# Altium PCB Urukul.PcbDoc (part 6 of 15)
Units mm, origin at the board's own origin, x right, y up, seen from the top; angles counter-clockwise.
Board outline 161.99 x 100 mm, 6 copper layers (L1, L2, L3, L4, P5, L6), stack 1.548 mm thick; 1078 components, 609 nets, 3798 pads, 2552 vias.
Unrouted connection lines stored in the file: 1.
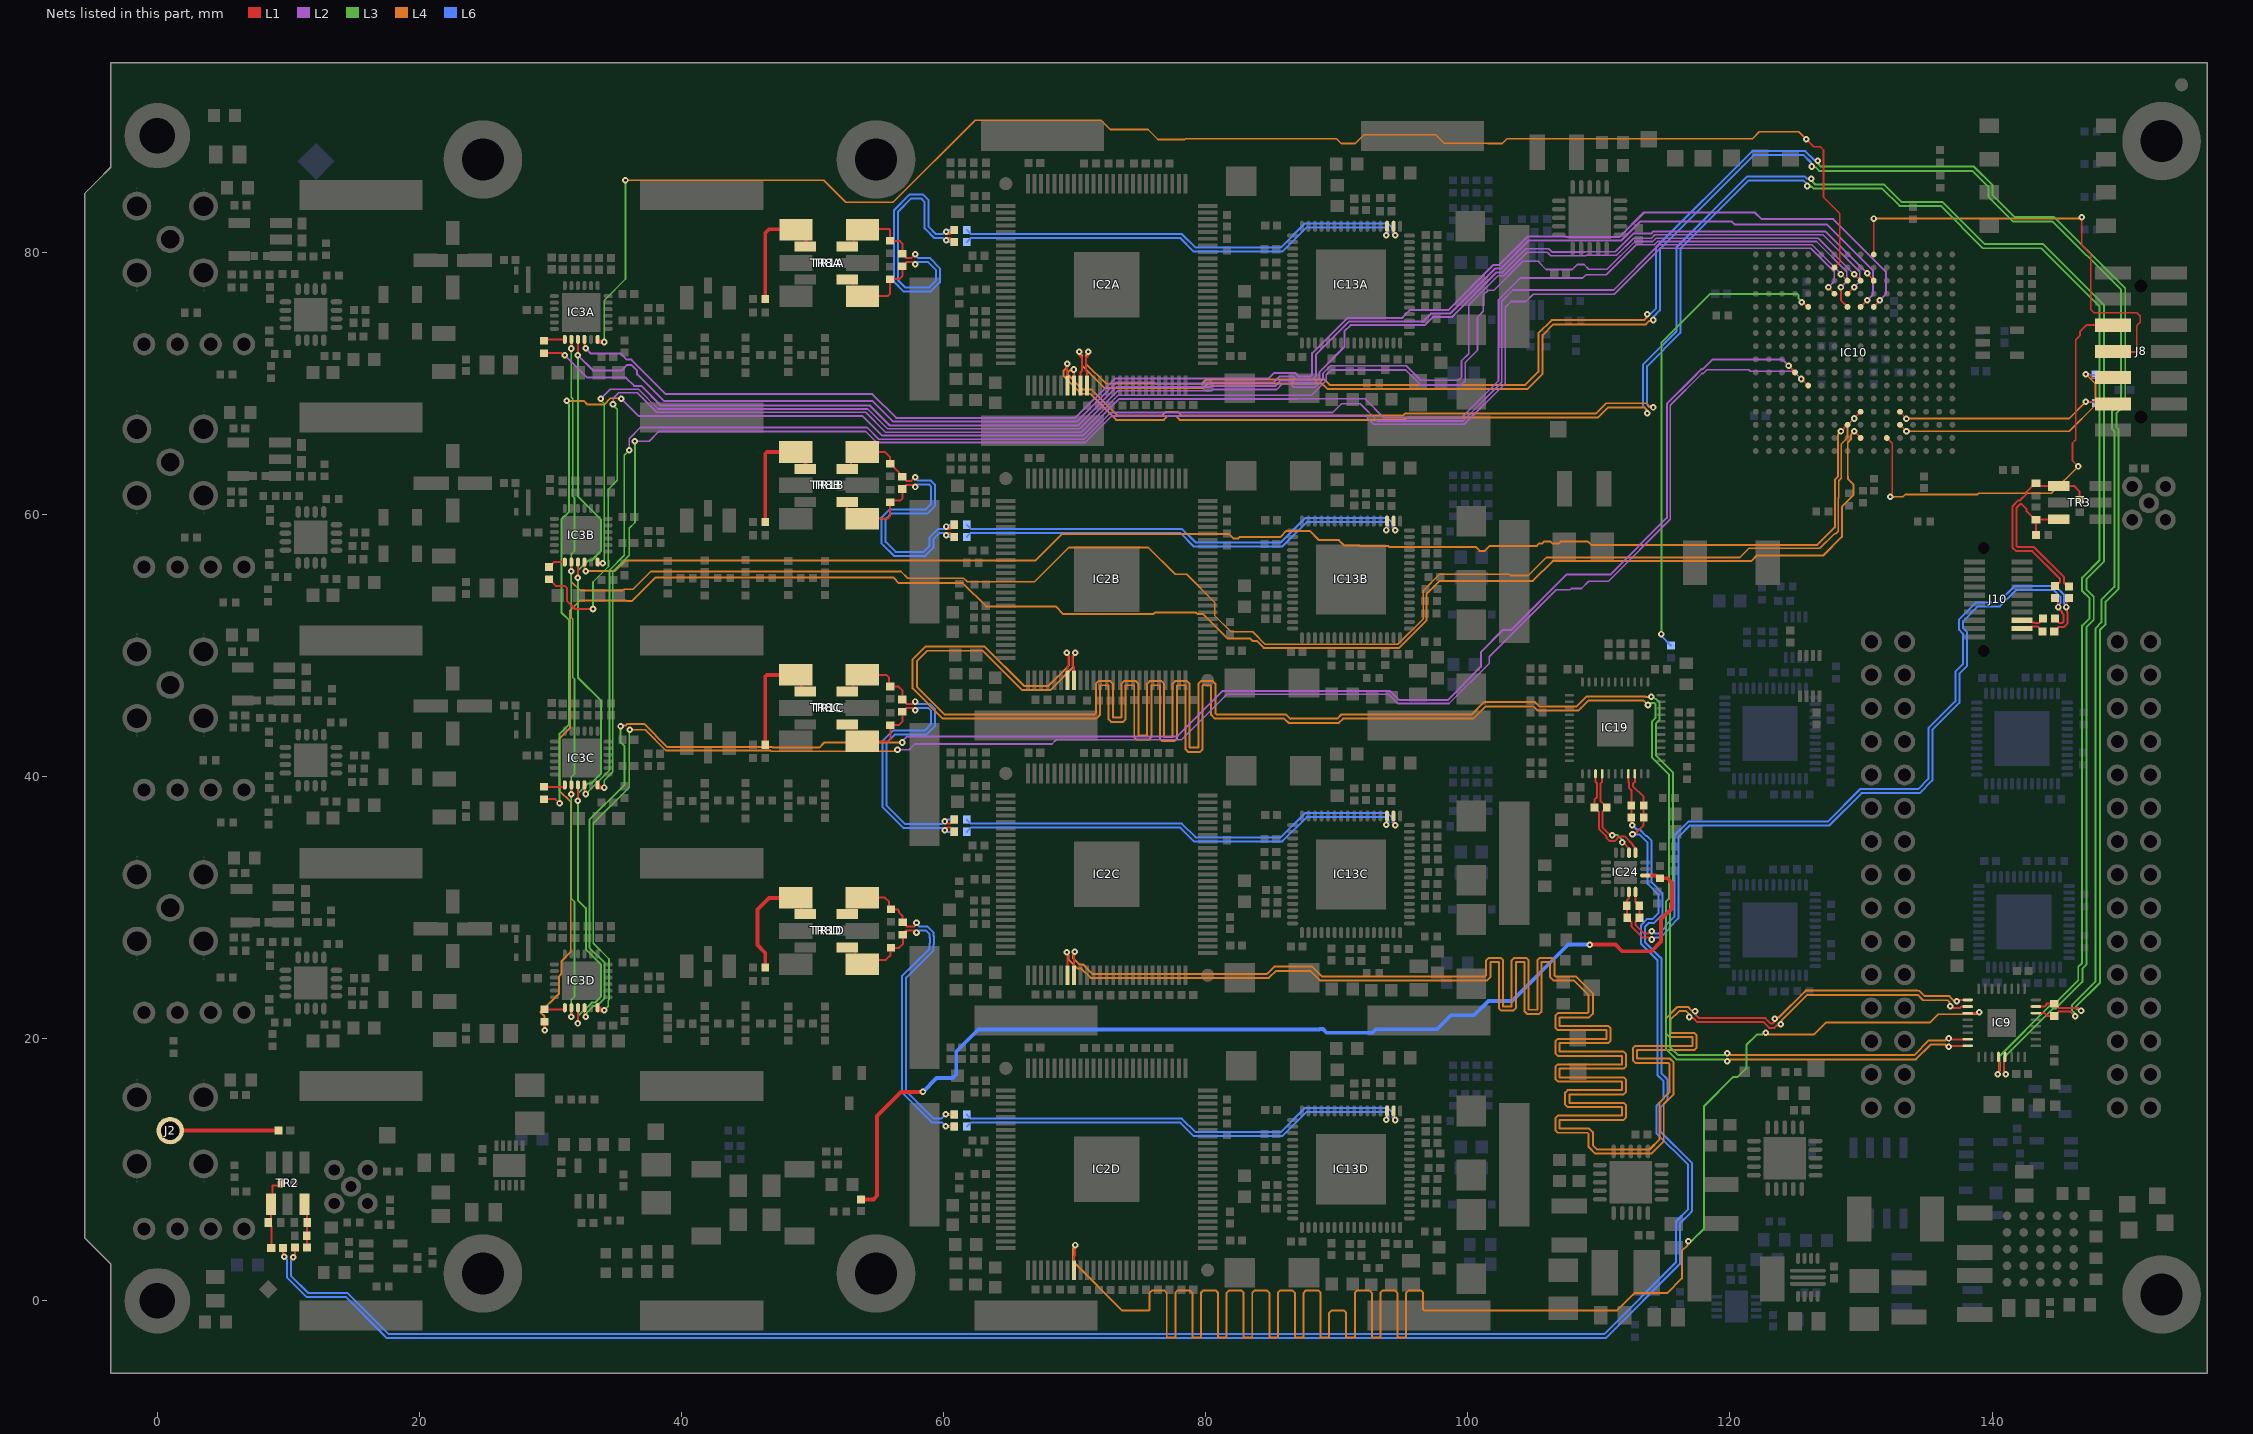
[diagram p8: the nets of this part, all layers, seen from the top]

## Via types
v1: diameter 0.5, hole 0.2, L1 to L6, tented both sides, 1964 vias
v2: diameter 0.5, hole 0.2, L1 to L6, 480 vias
v3: diameter 0.6, hole 0.3, L1 to L6, tented both sides, 52 vias
v4: diameter 0.6, hole 0.3, L1 to L6, 36 vias
v5: diameter 0.762, hole 0.508, L1 to L6, tented both sides, 20 vias

## Nets (pads, with @x,y where several pads share a name; then routed paths per layer and width w, separated by ;. In a path a pad name is that pad's centre, name@x,y a point inside that pad or via, vN(x,y) a via of type N, cw(c..) or ccw(c..) an arc to the next point about the centre after c; other vN are vias at no path point) (continued)
DDS2_SYNC_IN_N: (continued)
  L4 w0.15: v1(70.016,26.633) 70.016,26.538 69.858,26.381 69.858,26.158 70.352,25.664 70.635,25.664 71.346,24.953 84.688,24.953 85.237,25.502 88.111,25.502 88.865,24.748 101.134,24.748 101.303,24.748 101.391,24.836 101.391,25.986 101.578,26.174 102.501,26.174 102.689,25.986 102.689,22.468 103.347,22.468 103.347,25.986 103.534,26.174 104.457,26.174 104.645,25.986 104.645,22.208 105.303,22.208 105.303,25.986 105.49,26.174 106.413,26.174 106.601,25.986 106.601,24.836 106.688,24.748 107.277,24.748 108.241,24.748 109.532,23.457 109.532,22.788 109.532,21.902 109.257,21.626 106.992,21.626 106.992,20.968 110.705,20.968 110.892,20.781 110.892,19.858 110.705,19.67 106.992,19.67 106.992,19.012 111.885,19.012 112.072,18.825 112.072,17.902 111.885,17.714 106.992,17.714 106.992,17.056 111.885,17.056 112.072,16.869 112.072,15.946 111.885,15.758 107.745,15.758 107.745,15.1 111.885,15.1 112.072,14.913 112.072,13.99 111.885,13.802 106.992,13.802 106.992,13.144 109.257,13.144 109.532,12.869 109.532,12.568 109.532,11.867 109.857,11.542 110.994,11.542 110.998,11.546 113.859,11.546 114.629,12.316 114.629,15.15 115.382,15.902 115.382,17.902 115.382,18.07 115.294,18.158 112.787,18.158 112.599,18.346 112.599,19.269 112.787,19.456 117.13,19.456 117.13,20.114 115.415,20.114 115.139,20.39 115.139,20.958 115.139,21.561 115.999,22.42 116.798,22.42 117.052,22.166 117.27,22.166 v1(117.337,22.099) ; v1(123.42,21.535) 123.487,21.602 123.704,21.602 125.77,23.668 134.307,23.668 134.317,23.658 134.459,23.658 134.863,23.255 136.741,23.255 137.084,22.912 137.252,22.912 v1(137.319,22.845)
DDS2_SYNC_IN_P: IC2C.7 IC9.26 | length 163.4
  L1 w0.152: v1(69.381,26.608) 69.444,26.544 IC2C.7@69.444,24.841 ; v1@69.381,26.76 v1@69.457,26.684 ; v1(116.893,21.656) 116.96,21.589 117.182,21.589 117.51,21.262 122.569,21.262 122.997,20.833 123.382,20.833 123.575,21.026 123.797,21.026 v1(123.863,21.092) ; 137.036,22.345 137.571,22.345 137.681,22.455 IC9.26@138.141,22.455
  L4 w0.15: v1(69.381,26.608) 69.381,26.513 69.538,26.356 69.538,26.026 70.22,25.344 70.502,25.344 71.213,24.633 84.821,24.633 85.37,25.182 87.979,25.182 88.732,24.428 101.134,24.428 101.435,24.428 101.711,24.704 101.711,25.854 102.369,25.854 102.369,22.336 102.556,22.148 103.479,22.148 103.667,22.336 103.667,25.854 104.325,25.854 104.325,22.076 104.512,21.888 105.435,21.888 105.623,22.076 105.623,25.854 106.281,25.854 106.281,24.704 106.556,24.428 107.277,24.428 108.108,24.428 109.212,23.324 109.212,22.788 109.212,22.034 109.124,21.946 106.86,21.946 106.672,21.759 106.672,20.836 106.86,20.648 110.572,20.648 110.572,19.99 106.86,19.99 106.672,19.803 106.672,18.88 106.86,18.692 111.752,18.692 111.752,18.034 106.86,18.034 106.672,17.847 106.672,16.924 106.86,16.736 111.752,16.736 111.752,16.078 107.612,16.078 107.425,15.891 107.425,14.968 107.612,14.78 111.752,14.78 111.752,14.122 106.86,14.122 106.672,13.935 106.672,13.012 106.86,12.824 109.124,12.824 109.212,12.736 109.212,12.568 109.212,11.735 109.725,11.222 111.127,11.222 111.13,11.226 113.992,11.226 114.949,12.183 114.949,15.017 115.702,15.77 115.702,17.902 115.702,18.203 115.426,18.478 112.919,18.478 112.919,19.136 117.263,19.136 117.45,19.324 117.45,20.247 117.263,20.434 115.547,20.434 115.459,20.522 115.459,20.958 115.459,21.428 116.131,22.1 116.666,22.1 116.826,21.94 116.826,21.723 v1(116.893,21.656) ; v1(123.863,21.092) 123.93,21.159 123.93,21.376 125.902,23.348 134.317,23.348 134.73,22.935 136.608,22.935 136.758,22.785 136.758,22.528 v1(136.816,22.47)
DDS3_SYNC_IN_N: IC2D.8 IC9.27 | length 161.4
  L1 w0.152: IC2D.8@69.944,2.341 69.944,3.367 70.028,3.451 70.028,4.158 70.041,4.171 v1(70.041,4.256) ; IC9.27@138.141,21.955 138.958,21.955 v1(139.022,22.018)
  L3 w0.15: v1(116.834,4.541) 116.901,4.608 117.128,4.608 118.02,5.499 118.02,14.843 120.258,17.081 120.595,17.081 121.255,17.741 121.262,17.741 ; 121.263,17.741 121.263,19.524 122.053,20.314 122.474,20.314 122.628,20.467 v1(122.723,20.467)
  L4 w0.15: v1(70.041,4.256) 70.041,4.163 69.871,3.993 69.871,3.018 73.64,-0.751 75.469,-0.751 75.638,-0.751 75.726,-0.663 75.726,0.601 75.913,0.788 76.836,0.788 77.024,0.601 77.024,-2.787 77.682,-2.787 77.682,0.601 77.869,0.788 78.792,0.788 78.98,0.601 78.98,-2.787 79.638,-2.787 79.638,0.601 79.825,0.788 80.748,0.788 80.936,0.601 80.936,-2.787 81.594,-2.787 81.594,0.601 81.781,0.788 82.704,0.788 82.892,0.601 82.892,-2.787 83.55,-2.787 83.55,0.601 83.737,0.788 84.66,0.788 84.848,0.601 84.848,-2.787 85.506,-2.787 85.506,0.601 85.693,0.788 86.616,0.788 86.804,0.601 86.804,-2.787 87.462,-2.787 87.462,0.601 87.649,0.788 88.572,0.788 88.76,0.601 88.76,-2.787 89.418,-2.787 89.418,-0.914 89.605,-0.726 90.528,-0.726 90.716,-0.914 90.716,-2.787 91.374,-2.787 91.374,0.601 91.561,0.788 92.484,0.788 92.672,0.601 92.672,-2.787 93.33,-2.787 93.33,0.601 93.517,0.788 94.44,0.788 94.628,0.601 94.628,-2.787 95.286,-2.787 95.286,0.601 95.473,0.788 96.396,0.788 96.584,0.601 96.584,-0.663 96.671,-0.751 97.688,-0.751 111.374,-0.751 112.715,0.59 115.201,0.59 116.325,1.714 116.325,3.805 116.767,4.246 116.767,4.474 v1(116.834,4.541) ; v1(122.723,20.467) 122.817,20.467 122.971,20.314 126.4,20.314 127.312,21.225 135.252,21.225 135.892,21.865 138.774,21.865 138.927,22.018 v1(139.022,22.018)